# Altium PCB PCB.PcbDoc (part 7 of 7)
Units mm, origin at the board's own origin, x right, y up, seen from the top; angles counter-clockwise.
Board outline 78.8 x 69 mm, 12 copper layers (Top Layer, GND_12, uStrip1, GND_35, Clocks, GND_57, POWER, Slow_Ctrl, GND_810, uStrip2, GND_1012, Bottom Layer), stack 2.926 mm thick; 290 components, 212 nets, 1379 pads, 3418 vias.
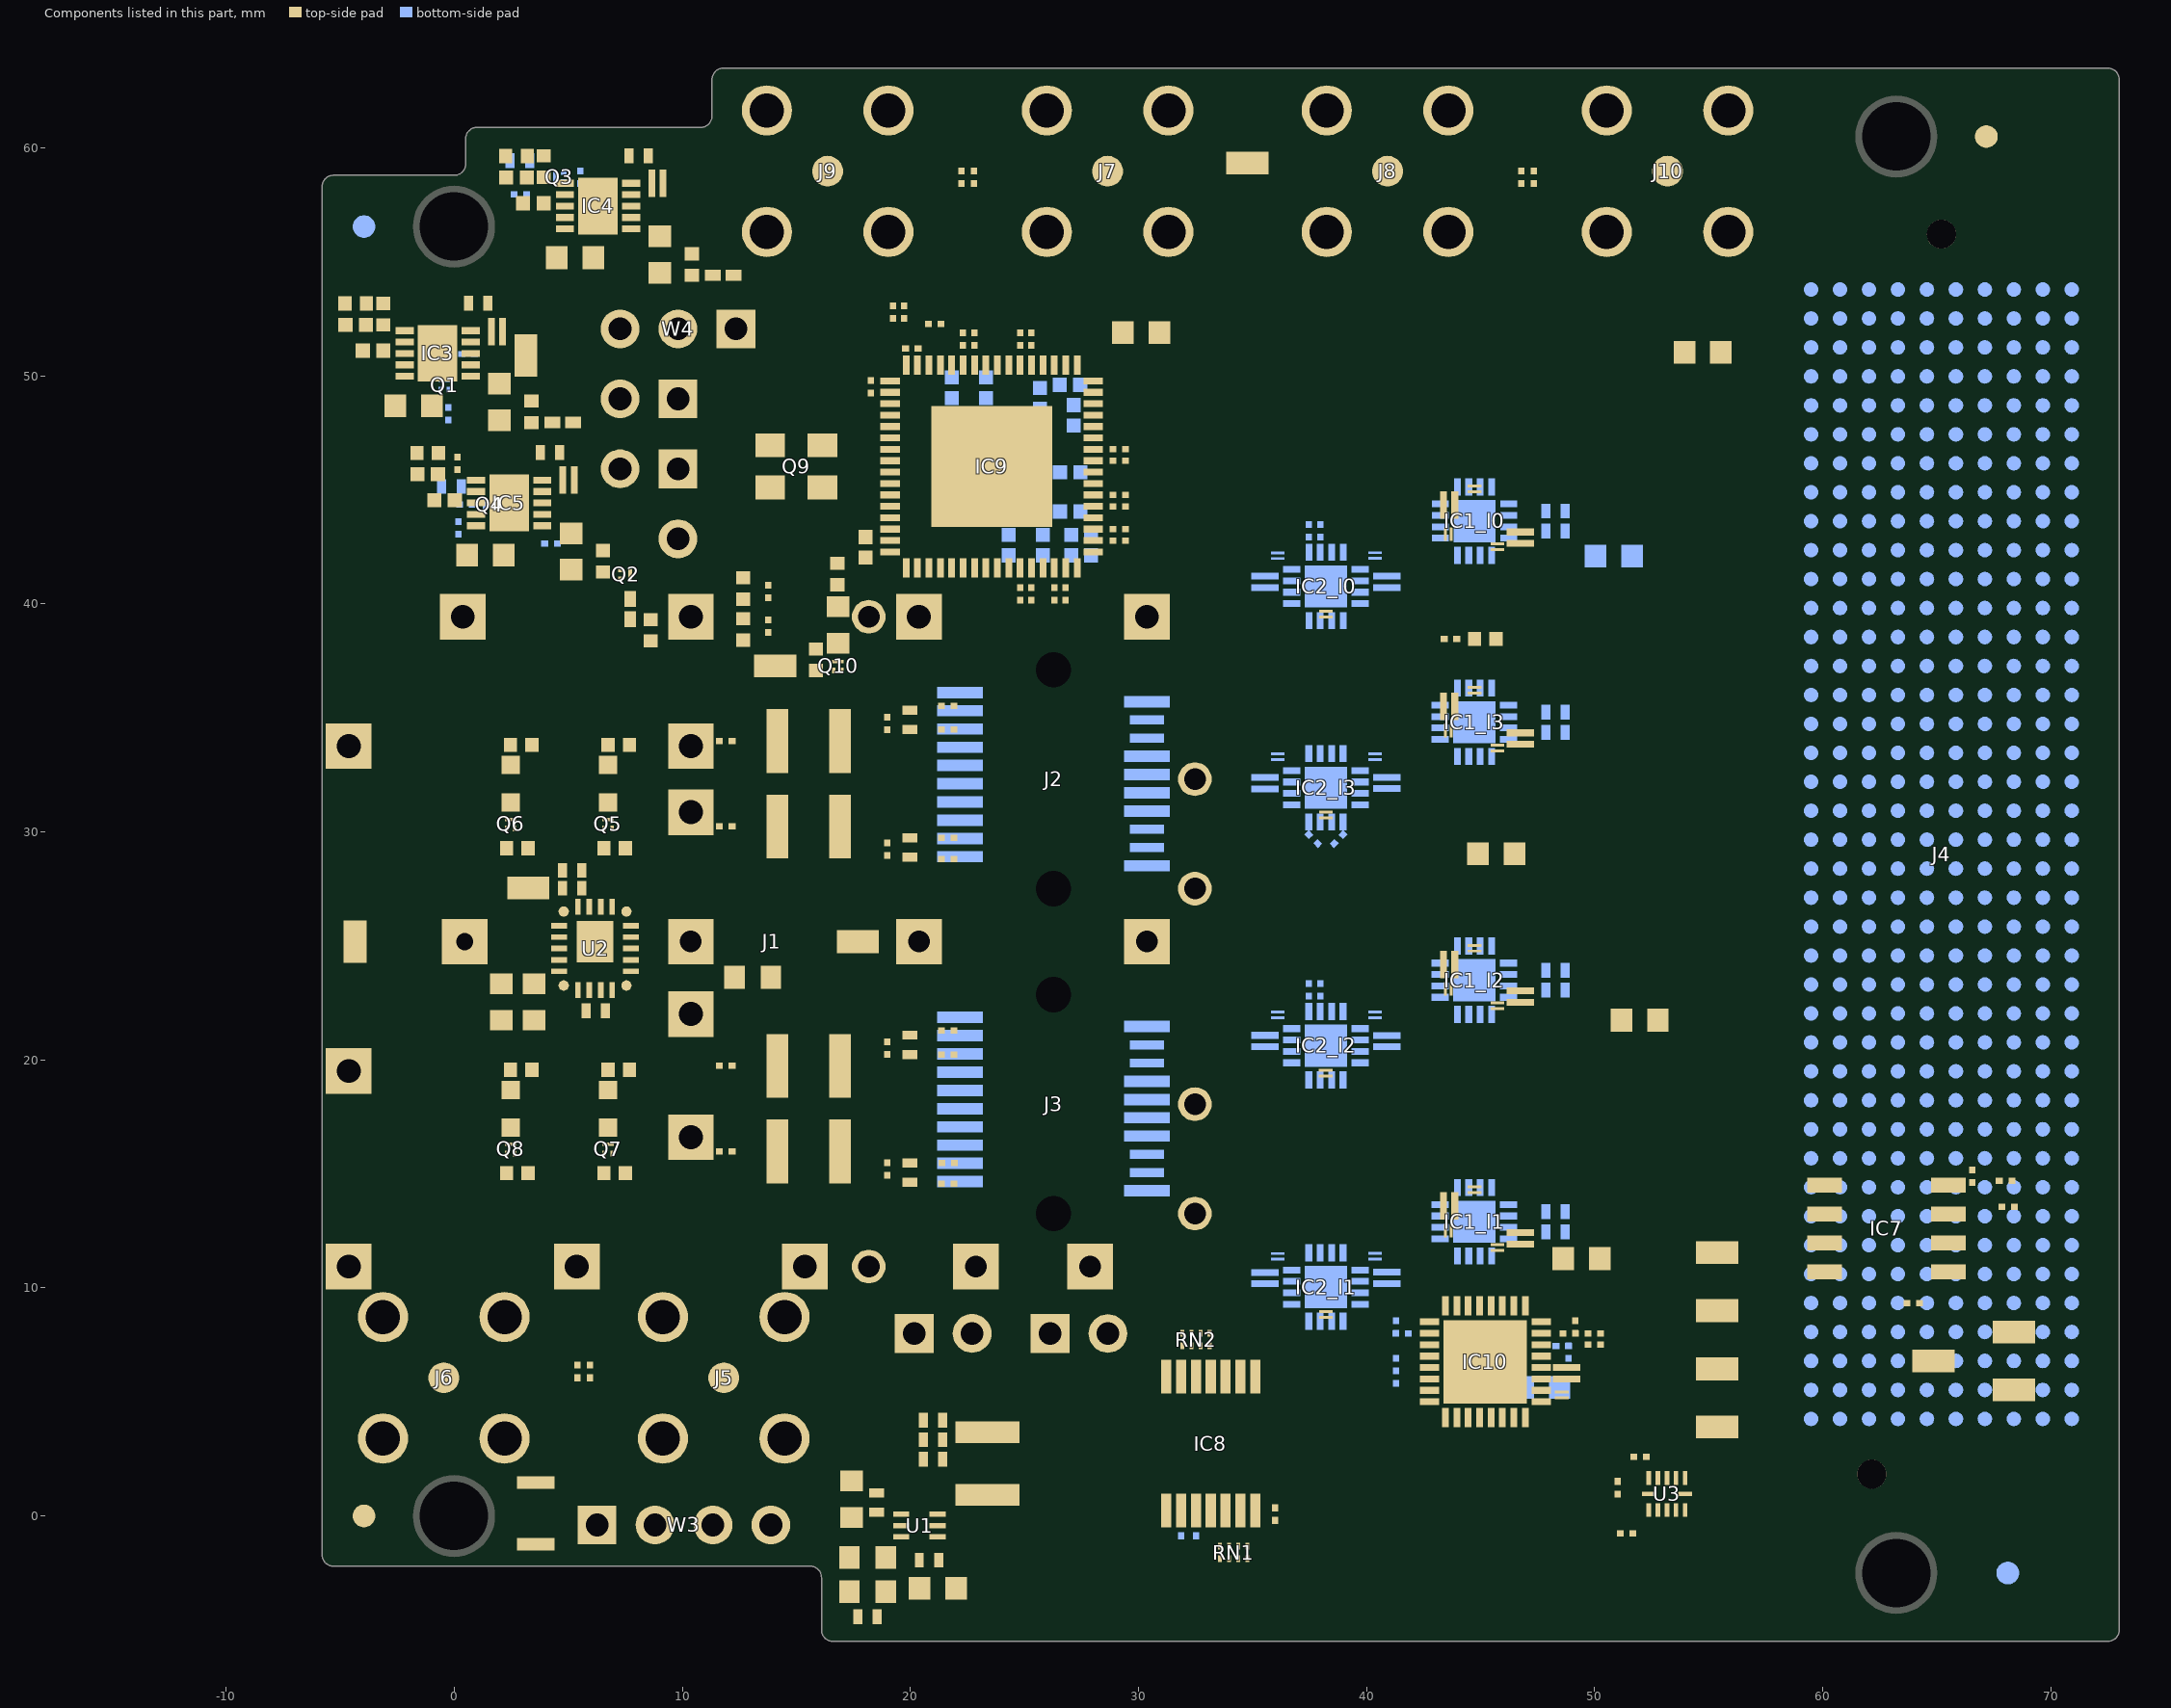
[diagram p16: the components of this part, seen from the top]

## Polygon pours and split planes (outlines as drawn) (continued)
P3V3 on GND_57 (split plane): -5.58,58.719 -5.627,58.68 -5.583,58.724 -5.526,58.748
P3V3 on GND_57 (split plane): -5.338,58.8 -5.398,58.794 -5.457,58.776 -5.399,58.8
P3V3 on GND_57 (split plane): 0.191,58.839 0.111,58.815 0.265,58.879
P3V3 on GND_57 (split plane): 0.353,58.947 0.288,58.894 0.406,59.012
P3V3 on GND_57 (split plane): 0.461,59.109 0.421,59.035 0.485,59.189
P3V3 on GND_57 (split plane): 0.506,60.498 0.5,60.438 0.5,60.499 0.524,60.557
P3V3 on GND_57 (split plane): 0.581,60.68 0.552,60.626 0.576,60.683 0.62,60.727
P3V3 on GND_57 (split plane): 0.72,60.819 0.673,60.78 0.717,60.824 0.774,60.848
P3V3 on GND_57 (split plane): 0.902,60.894 0.843,60.876 0.901,60.9 0.962,60.9
P3V3 on GND_57 (split plane): 10.991,60.939 10.911,60.915 11.065,60.979
P3V3 on GND_57 (split plane): 11.153,61.047 11.088,60.994 11.206,61.112
P3V3 on GND_57 (split plane): 11.261,61.209 11.221,61.135 11.285,61.289
P3V3 on GND_57 (split plane): 16.181,-5.28 16.22,-5.327 16.176,-5.283 16.152,-5.226
P3V3 on GND_57 (split plane): 16.32,-5.419 16.374,-5.448 16.317,-5.424 16.273,-5.38
P3V3 on GND_57 (split plane): 16.061,-2.509 16.085,-2.589 16.021,-2.435
P3V3 on GND_57 (split plane): 16.106,-5.098 16.124,-5.157 16.1,-5.099 16.1,-5.038
P3V3 on GND_57 (split plane): 16.502,-5.494 16.562,-5.5 16.501,-5.5 16.443,-5.476
P3V3 on GND_57 (split plane): 72.599,-5.5 72.538,-5.5 72.598,-5.494 72.657,-5.476
P3V3 on GND_57 (split plane): 72.783,-5.424 72.726,-5.448 72.78,-5.419 72.827,-5.38
P3V3 on GND_57 (split plane): 72.924,-5.283 72.88,-5.327 72.919,-5.28 72.948,-5.226
P3V3 on GND_57 (split plane): 73,-5.099 72.976,-5.157 72.994,-5.098 73,-5.038
P3V3 on GND_57 (split plane): 11.306,63.098 11.3,63.038 11.3,63.099 11.324,63.157
P3V3 on GND_57 (split plane): 15.791,-2.239 15.865,-2.279 15.711,-2.215
P3V3 on GND_57 (split plane): 11.381,63.28 11.352,63.226 11.376,63.283 11.42,63.327
P3V3 on GND_57 (split plane): 11.52,63.419 11.473,63.38 11.517,63.424 11.574,63.448
P3V3 on GND_57 (split plane): 11.702,63.494 11.643,63.476 11.701,63.5 11.762,63.5
P3V3 on GND_57 (split plane): 15.953,-2.347 16.006,-2.412 15.888,-2.294
P3V3 on GND_57 (split plane): 73,63.099 73,63.038 72.994,63.098 72.976,63.157
P3V3 on GND_57 (split plane): 72.657,63.476 72.598,63.494 72.538,63.5 72.599,63.5
P3V3 on GND_57 (split plane): 72.924,63.283 72.948,63.226 72.919,63.28 72.88,63.327
P3V3 on GND_57 (split plane): 72.783,63.424 72.827,63.38 72.78,63.419 72.726,63.448
P3V6 on POWER (split plane): 132 vertices, not listed, extent -5.545,-5.245 24.652,60.647
P3V3 on POWER (split plane): 78 vertices, not listed, extent 4.866,-1.109 68.883,35.551
1V8 on POWER (split plane): 48 vertices, not listed, extent -1.829,5.254 54.164,60.644
P2V05 on POWER (split plane): 7.271,35.64 7.271,26.681 1.275,26.681 1.275,34.928 1.278,34.961 1.264,35.009 1.241,35.039 1.237,35.045 1.235,35.046 1.233,35.049 -1.829,37.632 -1.829,43.881 1.496,43.881
3V3APLL on POWER (split plane): 25 vertices, not listed, extent 2.687,41.394 22.09,51.007
VccR0 on POWER (split plane): 30.022,32.244 19.775,32.244 19.768,34.052 30.022,34.052
3V3PS on POWER (split plane): 67 vertices, not listed, extent 9.667,5.254 72.745,63.245
VREFAC on POWER (split plane): 42 vertices, not listed, extent 43.577,10.756 45.869,45.399
VADJ on POWER (split plane): 17 vertices, not listed, extent 37.821,-1.109 65.947,6.036
P12V on POWER (split plane): 40 vertices, not listed, extent 21.364,-5.245 72.745,11.007
VccR1 on POWER (split plane): 30.022,17.994 19.775,17.994 19.775,19.802 30.022,19.802
VccT0 on POWER (split plane): 30.022,30.178 19.775,30.178 19.775,31.986 30.022,31.986
P3V3A on POWER (split plane): 68.248,13.279 65.967,13.279 65.967,15.561 68.248,15.561
VccT1 on POWER (split plane): 30.022,15.928 19.775,15.928 19.775,17.736 30.022,17.736
no net on GND_810 (split plane): -5.794,-1.798 -5.776,-1.857 -5.8,-1.799 -5.8,-1.738
no net on GND_810 (split plane): -5.719,-1.98 -5.68,-2.027 -5.724,-1.983 -5.748,-1.926
no net on GND_810 (split plane): -5.794,58.398 -5.8,58.338 -5.8,58.399 -5.776,58.457
no net on GND_810 (split plane): -5.719,58.58 -5.748,58.526 -5.724,58.583 -5.68,58.627
no net on GND_810 (split plane): -5.58,-2.119 -5.526,-2.148 -5.583,-2.124 -5.627,-2.08
no net on GND_810 (split plane): -5.398,-2.194 -5.338,-2.2 -5.399,-2.2 -5.457,-2.176
GND on GND_810 (split plane): 143 vertices, not listed, extent -5.799,-5.499 72.999,63.499
no net on GND_810 (split plane): -5.58,58.719 -5.627,58.68 -5.583,58.724 -5.526,58.748
no net on GND_810 (split plane): -5.338,58.8 -5.398,58.794 -5.457,58.776 -5.399,58.8
no net on GND_810 (split plane): 0.191,58.839 0.111,58.815 0.265,58.879
no net on GND_810 (split plane): 0.353,58.947 0.288,58.894 0.406,59.012
no net on GND_810 (split plane): 0.461,59.109 0.421,59.035 0.485,59.189
no net on GND_810 (split plane): 0.506,60.498 0.5,60.438 0.5,60.499 0.524,60.557
no net on GND_810 (split plane): 0.581,60.68 0.552,60.626 0.576,60.683 0.62,60.727
no net on GND_810 (split plane): 0.72,60.819 0.673,60.78 0.717,60.824 0.774,60.848
no net on GND_810 (split plane): 0.902,60.894 0.843,60.876 0.901,60.9 0.962,60.9
no net on GND_810 (split plane): 10.991,60.939 10.911,60.915 11.065,60.979
no net on GND_810 (split plane): 11.153,61.047 11.088,60.994 11.206,61.112
no net on GND_810 (split plane): 11.261,61.209 11.221,61.135 11.285,61.289
no net on GND_810 (split plane): 16.181,-5.28 16.22,-5.327 16.176,-5.283 16.152,-5.226
no net on GND_810 (split plane): 16.32,-5.419 16.374,-5.448 16.317,-5.424 16.273,-5.38
no net on GND_810 (split plane): 16.061,-2.509 16.085,-2.589 16.021,-2.435
no net on GND_810 (split plane): 16.106,-5.098 16.124,-5.157 16.1,-5.099 16.1,-5.038
no net on GND_810 (split plane): 16.502,-5.494 16.562,-5.5 16.501,-5.5 16.443,-5.476
no net on GND_810 (split plane): 72.599,-5.5 72.538,-5.5 72.598,-5.494 72.657,-5.476
no net on GND_810 (split plane): 72.783,-5.424 72.726,-5.448 72.78,-5.419 72.827,-5.38
no net on GND_810 (split plane): 72.924,-5.283 72.88,-5.327 72.919,-5.28 72.948,-5.226
no net on GND_810 (split plane): 73,-5.099 72.976,-5.157 72.994,-5.098 73,-5.038
no net on GND_810 (split plane): 11.306,63.098 11.3,63.038 11.3,63.099 11.324,63.157
no net on GND_810 (split plane): 15.791,-2.239 15.865,-2.279 15.711,-2.215
no net on GND_810 (split plane): 11.381,63.28 11.352,63.226 11.376,63.283 11.42,63.327
no net on GND_810 (split plane): 11.52,63.419 11.473,63.38 11.517,63.424 11.574,63.448
no net on GND_810 (split plane): 11.702,63.494 11.643,63.476 11.701,63.5 11.762,63.5
no net on GND_810 (split plane): 15.953,-2.347 16.006,-2.412 15.888,-2.294
no net on GND_810 (split plane): 73,63.099 73,63.038 72.994,63.098 72.976,63.157
no net on GND_810 (split plane): 72.657,63.476 72.598,63.494 72.538,63.5 72.599,63.5
no net on GND_810 (split plane): 72.924,63.283 72.948,63.226 72.919,63.28 72.88,63.327
no net on GND_810 (split plane): 72.783,63.424 72.827,63.38 72.78,63.419 72.726,63.448
no net on GND_1012 (split plane): -5.794,-1.798 -5.776,-1.857 -5.8,-1.799 -5.8,-1.738
no net on GND_1012 (split plane): -5.719,-1.98 -5.68,-2.027 -5.724,-1.983 -5.748,-1.926
no net on GND_1012 (split plane): -5.794,58.398 -5.8,58.338 -5.8,58.399 -5.776,58.457
no net on GND_1012 (split plane): -5.719,58.58 -5.748,58.526 -5.724,58.583 -5.68,58.627
no net on GND_1012 (split plane): -5.58,-2.119 -5.526,-2.148 -5.583,-2.124 -5.627,-2.08
no net on GND_1012 (split plane): -5.398,-2.194 -5.338,-2.2 -5.399,-2.2 -5.457,-2.176
GND on GND_1012 (split plane): 143 vertices, not listed, extent -5.799,-5.499 72.999,63.499
no net on GND_1012 (split plane): -5.58,58.719 -5.627,58.68 -5.583,58.724 -5.526,58.748
no net on GND_1012 (split plane): -5.338,58.8 -5.398,58.794 -5.457,58.776 -5.399,58.8
no net on GND_1012 (split plane): 0.191,58.839 0.111,58.815 0.265,58.879
no net on GND_1012 (split plane): 0.353,58.947 0.288,58.894 0.406,59.012
no net on GND_1012 (split plane): 0.461,59.109 0.421,59.035 0.485,59.189
no net on GND_1012 (split plane): 0.506,60.498 0.5,60.438 0.5,60.499 0.524,60.557
no net on GND_1012 (split plane): 0.581,60.68 0.552,60.626 0.576,60.683 0.62,60.727
no net on GND_1012 (split plane): 0.72,60.819 0.673,60.78 0.717,60.824 0.774,60.848
no net on GND_1012 (split plane): 0.902,60.894 0.843,60.876 0.901,60.9 0.962,60.9
no net on GND_1012 (split plane): 10.991,60.939 10.911,60.915 11.065,60.979
no net on GND_1012 (split plane): 11.153,61.047 11.088,60.994 11.206,61.112
no net on GND_1012 (split plane): 11.261,61.209 11.221,61.135 11.285,61.289
no net on GND_1012 (split plane): 16.181,-5.28 16.22,-5.327 16.176,-5.283 16.152,-5.226
no net on GND_1012 (split plane): 16.32,-5.419 16.374,-5.448 16.317,-5.424 16.273,-5.38
no net on GND_1012 (split plane): 16.061,-2.509 16.085,-2.589 16.021,-2.435
no net on GND_1012 (split plane): 16.106,-5.098 16.124,-5.157 16.1,-5.099 16.1,-5.038
no net on GND_1012 (split plane): 16.502,-5.494 16.562,-5.5 16.501,-5.5 16.443,-5.476
no net on GND_1012 (split plane): 72.599,-5.5 72.538,-5.5 72.598,-5.494 72.657,-5.476
no net on GND_1012 (split plane): 72.783,-5.424 72.726,-5.448 72.78,-5.419 72.827,-5.38
no net on GND_1012 (split plane): 72.924,-5.283 72.88,-5.327 72.919,-5.28 72.948,-5.226
no net on GND_1012 (split plane): 73,-5.099 72.976,-5.157 72.994,-5.098 73,-5.038
no net on GND_1012 (split plane): 11.306,63.098 11.3,63.038 11.3,63.099 11.324,63.157
no net on GND_1012 (split plane): 15.791,-2.239 15.865,-2.279 15.711,-2.215
no net on GND_1012 (split plane): 11.381,63.28 11.352,63.226 11.376,63.283 11.42,63.327
no net on GND_1012 (split plane): 11.52,63.419 11.473,63.38 11.517,63.424 11.574,63.448
no net on GND_1012 (split plane): 11.702,63.494 11.643,63.476 11.701,63.5 11.762,63.5
no net on GND_1012 (split plane): 15.953,-2.347 16.006,-2.412 15.888,-2.294
no net on GND_1012 (split plane): 73,63.099 73,63.038 72.994,63.098 72.976,63.157
no net on GND_1012 (split plane): 72.657,63.476 72.598,63.494 72.538,63.5 72.599,63.5
no net on GND_1012 (split plane): 72.924,63.283 72.948,63.226 72.919,63.28 72.88,63.327
no net on GND_1012 (split plane): 72.783,63.424 72.827,63.38 72.78,63.419 72.726,63.448

## Keep-outs
Keep-Out Layer:
  lines w0.254: 73.127,-5.001 cw(c72.5,-5) 72.5,-5.627 16.6,-5.627 ; 73.127,-5 73.127,63 ccw(c72.5,63) 73.127,63.001 ccw(c72.5,63) 72.501,63.627 ; -5.927,-1.7 ccw(c-5.3,-1.7) -5.3,-2.327 ; -5.927,-1.7 -5.927,58.3 ; -5.927,-1.7 -5.927,-1.7 ; -5.927,-1.7 -5.927,-1.7 ; -5.927,58.3 cw(c-5.3,58.3) -5.301,58.927 ; -5.927,58.3 -5.927,58.3 ; -5.301,58.927 cw(c-5.3,58.8) -5.3,58.927 ; -5.301,58.927 cw(c-5.3,58.3) -5.3,58.927 ; -5.3,-2.327 14.7,-2.327 15.599,-2.327 ; -5.3,-2.327 -5.3,-2.327 ; -5.3,-2.327 -5.3,-2.327 ; -5.3,58.927 -2,58.927 -0.5,58.927 0,58.927 ; 0,58.927 ccw(c0,59.3) 0.373,59.3 ; 0,58.927 ccw(c0,59.3) 0,58.927 ; 0,58.927 ccw(c0,58.8) 0,58.927 ; 0,58.927 ccw(c0,58.8) 0,58.927 ; 0,58.927 0,58.927 ; 0.373,59.3 cw(c0.5,59.3) 0.373,59.301 ; 0.373,59.3 ccw(c0,59.3) 0.373,59.3 ; 0.373,59.3 0.373,59.301 ; 0.373,59.301 0.373,60.4 ; 0.373,60.4 cw(c1,60.4) 0.999,61.027 ; 0.373,60.4 0.373,60.4 ; 1,61.027 ccw(c1,60.9) 1,61.027 ; 1,61.027 ccw(c1,60.9) 0.999,61.027 ; 1,61.027 ccw(c1,60.4) 0.999,61.027 ; 1,61.027 8,61.027 10.4,61.027 10.8,61.027 ; 10.8,61.027 ccw(c10.8,61.4) 11.173,61.4 ; 10.8,61.027 ccw(c10.8,61.4) 10.8,61.027 ; 10.8,61.027 ccw(c10.8,60.9) 10.8,61.027 ; 10.8,61.027 ccw(c10.8,60.9) 10.8,61.027 ; 10.8,61.027 10.8,61.027 ; 11.173,61.401 ccw(c11.3,61.4) 11.173,61.4 ; 11.173,61.4 ccw(c10.8,61.4) 11.173,61.4 ; 11.173,61.401 11.173,63 cw(c11.8,63) 11.799,63.627 ; 11.173,61.4 11.173,61.401 ; 11.8,63.627 ccw(c11.8,63.5) 11.8,63.627 ; 11.8,63.627 ccw(c11.8,63.5) 11.799,63.627 ; 11.8,63.627 ccw(c11.8,63) 11.799,63.627 ; 11.8,63.627 72.5,63.627 ; 15.599,-2.327 ccw(c15.6,-2.2) 15.6,-2.327 ; 15.599,-2.327 15.6,-2.327 ; 15.6,-2.327 cw(c15.6,-2.7) 15.973,-2.7 ; 15.973,-2.701 cw(c16.1,-2.7) 15.973,-2.7 ; 15.973,-2.701 15.973,-2.7 ; 15.973,-2.701 15.973,-5 ccw(c16.6,-5) 16.6,-5.627 ; 15.973,-2.7 ccw(c15.6,-2.7) 15.973,-2.7 ; 16.6,-5.627 ccw(c16.6,-5.5) 16.6,-5.627 ; 16.6,-5.627 ccw(c16.6,-5.5) 16.6,-5.627 ; 16.6,-5.627 ccw(c16.6,-5.5) 16.6,-5.627 ; 16.6,-5.627 ccw(c16.6,-5.5) 16.6,-5.627 ; 16.6,-5.627 16.6,-5.627 ; 16.6,-5.627 16.6,-5.627 ; 72.501,63.627 ccw(c72.5,63) 72.5,63.627

## Other copper
Top Layer:
  region net FPGA_TX1_C_P: 49.003,8.163 49.003,7.863 49.303,7.863 49.303,8.163
  rectangle net VREFAC: 43.801,38.157 45.207,38.777
  region net NetC12_l0_2: 37.978,39.497 37.978,38.953 38.478,38.953 38.478,39.497
  region net NetC12_l3_2: 37.977,30.671 37.977,30.128 38.477,30.128 38.477,30.671
  region net NetC12_l2_2: 37.968,19.358 37.968,18.814 38.468,18.814 38.468,19.358
  region net NetC12_l1_2: 37.977,8.771 37.977,8.227 38.477,8.227 38.477,8.771
  rectangle net XTAL_GND: 18.333,46.78 18.582,47.032
  pour cut-out: 63.862,10.154 63.839,10.281 64.874,10.281 64.851,10.154
  pour cut-out: 7.184,-0.099 7.161,0.028 7.936,0.028 7.913,-0.099
  pour cut-out: 12.225,-0.821 12.202,-0.694 13.024,-0.694 13.001,-0.821
  pour cut-out: 62.735,14.379 62.713,14.501 64.167,14.501 64.145,14.379
  pour cut-out: 3.145,34.231 2.573,34.231 2.606,34.104 3.118,34.104
  pour cut-out: 7.574,34.231 7.002,34.231 7.036,34.104 7.548,34.104
  pour cut-out: 2.97,29.699 2.398,29.699 2.431,29.572 2.943,29.572
  pour cut-out: 15.569,36.902 14.997,36.902 15.031,36.775 15.543,36.775
  pour cut-out: 27.757,15.819 26.849,15.819 26.883,15.692 27.731,15.692
  pour cut-out: 32.045,10.698 31.473,10.698 31.506,10.571 32.018,10.571
  pour cut-out: 59.463,13.58 59.336,13.557 59.336,14.241 59.463,14.218
  pour cut-out: 3.277,58.292 3.277,57.977 3.404,58.011 3.404,58.265
  pour cut-out: 8.302,59.524 7.988,59.524 8.021,59.397 8.275,59.397
  pour cut-out: -3.755,51.83 -3.755,51.515 -3.628,51.549 -3.628,51.803
  pour cut-out: 1.27,53.062 0.955,53.062 0.989,52.935 1.243,52.935
  pour cut-out: 4.409,46.507 4.095,46.507 4.129,46.38 4.383,46.38
  pour cut-out: -0.616,45.275 -0.616,44.96 -0.489,44.994 -0.489,45.248
  pour cut-out: 14.232,39.636 14.232,39.95 14.105,39.917 14.105,39.663
  region net NetC31_2: 7.351,57.799 8.803,57.799 8.803,59.977 8.311,59.977 8.311,59.3 8.503,59.3 8.503,58.099 7.351,58.099
  region net NetC18_2: 0.318,51.337 1.771,51.337 1.771,53.515 1.278,53.515 1.278,52.865 1.471,52.865 1.471,51.637 0.318,51.637
  pour cut-out: 51.647,21.897 51.647,21.583 51.774,21.617 51.774,21.871
  pour cut-out: 44.409,28.896 44.409,29.21 44.282,29.176 44.282,28.922
  pour cut-out: 45.359,29.203 45.359,28.888 45.486,28.922 45.486,29.176
  pour cut-out: 30.433,51.754 30.433,52.068 30.306,52.035 30.306,51.781
  pour cut-out: 31.383,52.061 31.383,51.747 31.51,51.781 31.51,52.035
  pour cut-out: 55.063,50.88 55.063,51.195 54.936,51.161 54.936,50.907
  pour cut-out: 56.013,51.188 56.013,50.873 56.14,50.907 56.14,51.161
  pour cut-out: 50.697,21.59 50.697,21.904 50.57,21.871 50.57,21.617
  pour cut-out: 48.142,11.135 48.142,11.449 48.015,11.416 48.015,11.162
  pour cut-out: 49.092,11.442 49.092,11.128 49.219,11.162 49.219,11.416
  region net NetC22_2: 19.95,-0.034 18.182,-0.034 18.182,0.365 19.241,0.365 19.95,0.195
  pour cut-out: 18.934,0.435 18.934,0.793 18.743,0.536
  region net NetC29_1: 19.95,-0.805 19.239,-0.805 16.872,-0.805 16.872,-1.325 16.872,-3.826 17.497,-4.747 17.897,-4.747 17.897,-4.097 17.772,-3.826 17.772,-2.325 17.772,-1.325 19.239,-1.034 19.95,-1.034
  region net P3V6: 18.347,-4.097 18.472,-2.826 19.372,-2.826 19.372,-3.826 18.747,-4.747 18.347,-4.747
  pour cut-out: 18.345,-3.07 18.345,-1.305 17.924,-1.409 17.924,-3.001
  pour cut-out: 18.345,-2.429 18.345,-2.787 18.756,-2.826 18.756,-2.445
  pour cut-out: 20.975,-2.619 20.975,-2.261 20.554,-2.364 20.554,-2.549
  region net 3V3APLL: 18.432,43.348 18.714,43.63 19.533,43.63 19.533,43.93 18.218,43.93 17.722,43.434 17.722,42.62 18.432,42.62
  region net P3V3: 33.204,8.158 33.204,7.858 31.829,7.858 31.829,8.158
  region net NetR55_1: 12.168,40.903 12.665,40.903 12.665,41.403 12.168,41.403
  region net NetR56_1: 12.168,38.163 12.665,38.163 12.665,38.663 12.168,38.663
  region net PLL_Lock: 15.362,37.771 15.86,37.771 15.86,38.271 15.362,38.271
  region net XTAL_GND: 18.433,44.88 18.183,45.13 18.483,45.43 19.533,45.43 19.533,45.13 18.683,45.13
  region net XTAL_GND: 18.433,47.18 18.183,46.93 18.483,46.63 19.533,46.63 19.533,46.93 18.683,46.93
  region net SFP0_LOS: 2.982,29.785 2.982,29.204 3.482,29.204 3.482,29.785
  region net VccT1: 7.93,18.473 7.93,19.653 7.43,19.653 7.43,18.473
  region net VccR0: 3.657,33.322 3.657,33.903 3.157,33.903 3.157,33.322
  region net VccT0: 7.93,32.723 7.93,33.903 7.43,33.903 7.43,32.723
  region net SFP0_FAULT: 7.255,29.785 7.255,29.204 7.755,29.204 7.755,29.785
  region net VccR1: 3.657,19.072 3.657,19.653 3.157,19.653 3.157,19.072
  region net SFP1_LOS: 2.982,15.535 2.982,14.954 3.482,14.954 3.482,15.535
  region net SFP1_FAULT: 7.255,15.535 7.255,14.954 7.755,14.954 7.755,15.535
  region net NetIC4_6: 2.867,59.952 4.451,59.952 5.251,59.332 5.251,58.299 4.451,58.299 4.451,59.332 2.867,59.332
  region net NetC30_2: 2.847,59.012 4.227,59.012 4.227,58.392 4.492,58.099 5.251,58.099 5.251,57.799 4.451,57.799 3.917,58.392 2.847,58.392
  region net P3V6: 5.251,57.099 5.251,55.799 4.317,55.799 4.317,57.099
  region net 3V3PS_EN: 7.501,58.845 7.501,58.299 8.001,58.299 8.001,58.845
  region net NetIC5_6: -1.026,46.935 0.558,46.935 1.358,46.315 1.358,45.282 0.558,45.282 0.558,46.236 -1.026,46.236
  region net NetC39_2: -1.046,46.076 0.334,46.076 0.334,45.375 0.6,45.082 1.358,45.082 1.358,44.782 0.558,44.782 0.024,45.375 -1.046,45.375
  region net 1V8_EN: 3.608,45.828 3.608,45.282 4.108,45.282 4.108,45.828
  region net P2V05: 1.358,44.082 1.358,42.782 0.424,42.782 0.424,44.082
  region net NetC40_2: 3.458,44.782 4.911,44.782 4.911,46.96 4.418,46.96 4.418,46.31 4.611,46.31 4.611,45.082 3.458,45.082
  region net P3V6: -1.782,50.637 -1.782,49.337 -2.715,49.337 -2.715,50.637
  region net 3V3APLL_EN: 0.468,52.383 0.468,51.837 0.968,51.837 0.968,52.383
  region net NetC17_2: -4.186,52.55 -2.806,52.55 -2.806,51.93 -2.54,51.637 -1.782,51.637 -1.782,51.337 -2.582,51.337 -3.116,51.93 -4.186,51.93
  region net NetIC3_6: -4.166,53.49 -2.582,53.49 -1.782,52.87 -1.782,51.837 -2.582,51.837 -2.582,52.87 -4.166,52.87
uStrip1:
  pour cut-out: 53.195,57.981 cw(c53.195,58.981) 52.195,58.981 cw(c53.195,58.981) 53.195,59.981 cw(c53.195,58.981) 54.195,58.981 cw(c53.195,58.981)
  pour cut-out: 40.92,57.981 cw(c40.92,58.981) 39.92,58.981 cw(c40.92,58.981) 40.92,59.981 cw(c40.92,58.981) 41.92,58.981 cw(c40.92,58.981)
  pour cut-out: 28.645,57.981 cw(c28.645,58.981) 27.645,58.981 cw(c28.645,58.981) 28.645,59.981 cw(c28.645,58.981) 29.645,58.981 cw(c28.645,58.981)
  pour cut-out: 16.37,57.981 cw(c16.37,58.981) 15.37,58.981 cw(c16.37,58.981) 16.37,59.981 cw(c16.37,58.981) 17.37,58.981 cw(c16.37,58.981)
  pour cut-out: -0.461,5.062 cw(c-0.461,6.062) -1.461,6.062 cw(c-0.461,6.062) -0.461,7.062 cw(c-0.461,6.062) 0.539,6.062 cw(c-0.461,6.062)
  pour cut-out: 11.814,5.062 cw(c11.814,6.062) 10.814,6.062 cw(c11.814,6.062) 11.814,7.062 cw(c11.814,6.062) 12.814,6.062 cw(c11.814,6.062)
  pour cut-out: 53.734,5.946 53.711,6.073 54.478,6.073 54.455,5.946
  pour cut-out: 55.206,9.768 55.333,9.791 55.333,9.14 55.206,9.163
  pour cut-out: 20.296,47.123 18.546,48.872 12.614,48.872 11.673,47.931 11.673,43.869 13.094,42.454 18.09,42.454 20.296,44.66
Clocks:
  pour cut-out: 59.394,36.747 58.709,36.747 ccw(c58.709,36.578) 58.541,36.56
  pour cut-out: 55.138,15.026 55.138,15.711 ccw(c54.969,15.711) 54.951,15.879
  pour cut-out: 20.296,47.123 18.546,48.872 12.614,48.872 11.673,47.931 11.673,43.869 13.094,42.454 18.09,42.454 20.296,44.66
Slow_Ctrl:
  pour cut-out: 22.788,31.735 23.514,31.735 23.514,30.844
  pour cut-out: 22.988,20.211 22.988,20.938 23.878,20.938
  pour cut-out: 24.492,14.216 24.492,13.49 23.602,13.49
  pour cut-out: 53.209,2.943 52.949,3.282 54.062,3.282
  pour cut-out: 52.979,-0.021 52.979,0.869 53.869,0.869
  pour cut-out: 45.639,1.091 45.639,1.818 46.529,1.818
  pour cut-out: 65.07,43.275 65.07,44.001 65.96,44.001
  pour cut-out: 21.003,18.3 21.003,17.573 20.112,17.573
  pour cut-out: 31.401,9.975 31.401,10.702 32.292,10.702
  pour cut-out: 27.379,7.289 27.595,5.756 25.817,6.014
  pour cut-out: 49.872,-3.646 49.872,-4.907 47.841,-4.907
  pour cut-out: 23.504,34.555 23.504,33.014 22.074,33.124
  pour cut-out: 67.001,40.102 67.001,40.85 67.599,40.85
  pour cut-out: 67.214,44.703 67.214,43.896 66.225,43.896
  pour cut-out: 52.475,52.49 52.475,52.979 53.073,52.979
  pour cut-out: 21.812,53.146 21.812,53.635 22.41,53.635
  pour cut-out: 9.015,53.649 9.015,54.137 9.613,54.137
  pour cut-out: 20.296,47.123 18.546,48.872 12.614,48.872 11.673,47.931 11.673,43.869 13.094,42.454 18.09,42.454 20.296,44.66
uStrip2:
  pour cut-out: 20.296,47.123 18.546,48.872 12.614,48.872 11.673,47.931 11.673,43.869 13.094,42.454 18.09,42.454 20.296,44.66
Bottom Layer:
  pour cut-out: 5.834,59.28 5.834,59.579 5.566,59.579
  pour cut-out: 26.879,43.434 26.752,43.411 26.752,43.711 26.879,43.688
  region net 3V3_PS_DIS: 5.242,59.28 5.242,58.845 5.834,58.845 5.834,59.28
  pour cut-out: 51.159,41.941 51.159,42.255 51.032,42.222 51.032,41.968
  pour cut-out: 52.109,42.248 52.109,41.934 52.236,41.968 52.236,42.222
  pour cut-out: 63.253,35.462 63.38,35.485 63.38,35.185 63.253,35.208
  pour cut-out: 57.562,36.351 57.585,36.224 57.285,36.224 57.308,36.351
  pour cut-out: 1.004,51.225 1.027,51.098 0.727,51.098 0.75,51.225
  pour cut-out: 4.791,42.531 4.664,42.508 4.664,42.808 4.791,42.785
  pour cut-out: -0.877,45.307 -0.75,45.33 -0.75,45.03 -0.877,45.053
  pour cut-out: -0.527,48.195 -0.4,48.218 -0.4,47.918 -0.527,47.941
  pour cut-out: 0.75,50.697 0.727,50.824 1.027,50.824 1.004,50.697
  pour cut-out: 2.777,59.323 2.65,59.3 2.65,59.6 2.777,59.577
  pour cut-out: 2.123,59.577 2.25,59.6 2.25,59.3 2.123,59.323
  pour cut-out: 5.39,58.168 5.367,58.295 5.667,58.295 5.644,58.168
  region net 3V3PS: 47.987,6.131 47.987,5.131 49.758,5.131 49.758,6.131
  pour cut-out: 20.296,47.123 18.546,48.872 12.614,48.872 11.673,47.931 11.673,43.869 13.094,42.454 18.09,42.454 20.296,44.66
GND_12 (plane layer: these items are gaps in the copper):
  region: 53.195,57.981 cw(c53.195,58.981) 52.195,58.981 cw(c53.195,58.981) 53.195,59.981 cw(c53.195,58.981) 54.195,58.981 cw(c53.195,58.981)
  region: 40.92,57.981 cw(c40.92,58.981) 39.92,58.981 cw(c40.92,58.981) 40.92,59.981 cw(c40.92,58.981) 41.92,58.981 cw(c40.92,58.981)
  region: 28.645,57.981 cw(c28.645,58.981) 27.645,58.981 cw(c28.645,58.981) 28.645,59.981 cw(c28.645,58.981) 29.645,58.981 cw(c28.645,58.981)
  region: 16.37,57.981 cw(c16.37,58.981) 15.37,58.981 cw(c16.37,58.981) 16.37,59.981 cw(c16.37,58.981) 17.37,58.981 cw(c16.37,58.981)
  region: 11.814,5.062 cw(c11.814,6.062) 10.814,6.062 cw(c11.814,6.062) 11.814,7.062 cw(c11.814,6.062) 12.814,6.062 cw(c11.814,6.062)
  region: -0.461,5.062 cw(c-0.461,6.062) -1.461,6.062 cw(c-0.461,6.062) -0.461,7.062 cw(c-0.461,6.062) 0.539,6.062 cw(c-0.461,6.062)
  lines w0.762: 11.931,44.118 13.238,42.81 18.051,42.81 20.044,44.803 20.044,47.127 18.457,48.714 12.667,48.714 11.931,47.978 11.931,44.118
POWER (plane layer: these items are gaps in the copper):
  region: 11.673,42.673 17.077,42.673 18.398,43.994 20.296,44.011 20.296,48.832 11.673,48.832
  lines w0.254: -1.959,44.012 -1.959,37.571 1.149,34.95 ; 1.145,34.953 1.145,26.552 4.704,26.552 7.4,26.552 7.4,35.681 ; 3.631,60.9 3.631,53.928 2.085,53.928 -1.936,50.755 -1.959,44.011 1.564,44.011 7.4,35.681 ; 4.736,26.552 4.736,6.679 24.782,6.679 24.782,0.412 ; 11.673,43.873 11.673,47.931 ; 11.673,48.832 11.673,42.673 16.489,42.673 ; 19.646,17.865 30.151,17.865 ; 20.296,44.66 20.296,47.123 ; 21.235,-5.5 21.235,0.412 24.8,0.412 26.449,-1.238 31.776,-1.238 32.573,-1.238 55.332,-1.238 58.97,2.4 60.181,3.612 69.013,3.612 69.013,7.557 67.988,7.557 67.988,11.136 69.138,11.136 73,7.274 ; 30.151,32.115 19.646,32.115 ; 37.691,-1.238 37.691,-0.304 54.33,-0.304 60.799,6.165 66.072,6.165 66.072,4.012 66.076,4.008 66.076,3.612 ; 47.248,5.168 47.248,7.143 54.294,14.189 54.294,55.632 9.537,55.632 9.537,60.9 ; 67.988,9.975 55.747,9.975 53.713,7.941 50.897,5.125 40.282,5.125 30.151,15.799 ; 7.4,35.681 13.262,35.681 13.262,25.821 19.646,19.931 ; 9.537,60.9 ccw(c9.537,60.9) 9.537,60.9 ; 9.537,60.9 ccw(c9.537,60.9) 9.537,60.9 ; 16.1,-2.7 ccw(c16.1,-2.7) 16.1,-2.7 ; 16.1,-2.7 16.1,-2.7 ; 16.489,42.673 16.489,41.264 22.22,41.264 22.22,48.819 21.489,49.549 21.489,51.137 2.558,51.137 2.558,48.832 20.296,48.832 20.296,43.994 18.398,43.994 17.077,42.673 16.489,42.673 ; 19.646,19.931 19.646,15.799 30.151,15.799 ; 19.646,19.931 30.151,19.931 30.151,15.799 ; 19.646,32.115 19.646,30.049 30.151,30.049 30.151,34.181 19.638,34.181 19.646,32.115 ; 72.5,63.5 ccw(c72.5,63.5) 72.5,63.5 ; 72.5,63.5 72.5,63.5 ; 73,7.274 ccw(c73,7.274) 73,7.274 ; 0,58.8 0,58.8 ; 11.3,63 ccw(c11.3,63) 11.3,63 ; 16.6,-5.5 16.6,-5.5 ; 43.448,21.652 43.449,12.186 44.637,10.626 45.999,10.626 45.999,45.528 43.449,45.528 43.449,42.464 43.942,42.464 43.942,41.789 43.449,41.789 43.448,33.641 43.941,33.641 43.941,32.966 43.448,32.966 43.448,22.327 43.941,22.327 43.941,21.652 43.448,21.652 ; 51.001,63.5 ccw(c51.001,63.5) 51.001,63.5 ; 65.838,13.15 68.378,13.15 68.378,15.69 65.838,15.69 65.838,13.15 ; 73,-5 73,-5
  lines w0.508: 0.5,60.4 0.5,59.3 cw(c0,59.3) 0,58.8 -5.3,58.8 ccw(c-5.3,58.3) -5.8,58.3 -5.8,-1.7 ccw(c-5.3,-1.7) -5.3,-2.2 15.6,-2.2 cw(c15.6,-2.7) 16.1,-2.7 16.1,-5 ccw(c16.6,-5) 16.6,-5.5 21.235,-5.5 72.5,-5.5 ccw(c72.5,-5) 73,-5 73,7.274 73,63 ccw(c72.5,63) 72.5,63.5 51.001,63.5 11.8,63.5 ccw(c11.8,63) 11.3,63 11.3,61.4 cw(c10.8,61.4) 10.8,60.9 9.537,60.9 3.631,60.9 1,60.9 ; 0.5,60.45 cw(c0.95,60.45) 0.95,60.9
GND_35 (plane layer: these items are gaps in the copper):
  region: 20.306,47.186 18.557,48.935 12.624,48.935 11.683,47.994 11.683,43.936 13.101,42.517 18.1,42.517 20.306,44.723
  lines w0.254: 11.683,43.936 11.683,47.994 12.624,48.935 18.557,48.935 20.306,47.186 20.306,44.723 18.1,42.517 13.101,42.517 11.683,43.936
GND_57 (plane layer: these items are gaps in the copper):
  region: 20.306,47.186 18.557,48.935 12.624,48.935 11.683,47.994 11.683,43.936 13.101,42.517 18.1,42.517 20.306,44.723
  lines w0.254: 11.683,43.936 13.101,42.517 18.1,42.517 20.306,44.723 20.306,47.186 18.557,48.935 12.624,48.935 11.683,47.994 11.683,43.936
GND_810 (plane layer: these items are gaps in the copper):
  region: 20.28,47.186 18.53,48.935 12.598,48.935 11.657,47.994 11.657,43.936 13.075,42.517 18.074,42.517 20.28,44.723
  lines w0.254: 11.657,43.936 11.657,47.994 12.598,48.935 18.53,48.935 20.28,47.186 20.28,44.723 18.074,42.517 13.075,42.517 11.657,43.936
GND_1012 (plane layer: these items are gaps in the copper):
  region: 20.306,47.186 18.557,48.935 12.624,48.935 11.683,47.994 11.683,43.936 13.101,42.517 18.1,42.517 20.306,44.723
  lines w0.254: 11.683,43.936 13.101,42.517 18.1,42.517 20.306,44.723 20.306,47.186 18.557,48.935 12.624,48.935 11.683,47.994 11.683,43.936
Multi-Layer:
  pour cut-out: 17.628,43.473 17.628,43.715 17.337,43.64

## Silkscreen, mask and mechanical layers (free items; w line width, h text height)
Top Overlay:
  lines w0.178: 48.615,7.5 48.768,7.653 ; 48.921,7.5 48.768,7.653 ; 49.285,9.125 49.285,8.909 ; 49.502,8.909 49.285,8.909 ; 49.53,6.858 49.149,6.858 48.768,7.239 48.768,7.653 ; 50.038,9.398 49.775,9.398 49.285,8.909
  text "3V3PS" at 11.248,58.858 h0.76 r270
  text "3V3PS" at 33.001,56.549 h0.76
  text "P" at 23.591,56.407 h1.02
  text "N" at 48.141,56.407 h1.02
  text "N" at 20.747,56.333 h1.02
  text "P" at 45.297,56.333 h1.02
  text "GND" at 6.118,53.777 h0.76
  text "PLL IN1" at 19.331,53.479 h1.02
  text "PLL OUT" at 43.878,53.332 h1.02
  text "IN_SEL0" at 13.88,52.238 h0.76
  text "Vcc" at 14.375,50.854 h0.76
  text "SCL" at 11.631,49.941 h0.76 r270
  text "B" at 5.046,49.007 h0.76
  text "3V3APLL" at -3.902,47.232 h0.76
  text "SDA" at 11.635,46.974 h0.76 r270
  text "B" at 6.549,43.52 h0.76
  text "GND" at 11.545,41.726 h0.76
  text "1V8" at 5.173,39.317 h0.76
  text "PLL" at 15.025,38.998 h0.76 r90
  text "Lock" at 16.093,39.006 h0.76 r90
  text "SFP0 <-> GT0" at -4.325,36.568 h1.02
  text "Tx0" at 0.816,32.748 h0.76 r270
  text "Rx0" at 5.078,32.746 h0.76 r270
  text "Fault" at -0.253,32.74 h0.76 r270
  text "LOS" at 4.01,32.737 h0.76 r270
  text "P2V05" at -1.893,27.124 h0.76
  text "GND" at 16.688,23.546 h0.76
  text "P3V6" at -5.261,22.945 h0.76
  text "Fault" at -0.279,18.503 h0.76 r270
  text "Tx1" at 0.789,18.511 h0.76 r270
  text "LOS" at 4.011,18.502 h0.76 r270
  text "Rx1" at 5.079,18.511 h0.76 r270
  text "SFP1 <-> GT1" at -4.325,12.988 h1.02
  text "SI" at 56.64,11.167 h0.76
  text "GBTCLK1" at 7.39,11.046 h1.02
  text "LE" at 56.64,8.602 h0.76
  text "P" at 6.76,8.389 h1.02
  text "N" at 3.916,8.315 h1.02
  text "VADJ" at 63.568,7.603 h0.76
  text "P12V" at 69.454,7.478 h0.76
  text "SDO" at 56.64,6.078 h0.76
  text "SFP1Tx En" at 16.011,5.407 h0.76
  text "SFP0Tx En" at 23.756,5.407 h0.76
  text "P3V3" at 69.496,4.957 h0.76
  text "CLK" at 56.64,3.518 h0.76
  text "-" at 10.946,2.227 h1.02 r180
  text "-" at 12.724,2.227 h1.02 r180
  text "+" at 6.628,2.143 h1.02 r180
  text "+" at 8.406,2.143 h1.02 r180
  text "PT100" at 15.65,1.869 h0.76 r270
Bottom Overlay:
  lines w0.178: 40.272,5.016 40.544,5.016 41.034,5.505 ; 40.817,5.505 41.034,5.505 ; 41.034,5.288 41.034,5.505 ; 41.411,9.116 41.411,8.899 ; 41.628,8.899 41.411,8.899 ; 42.173,9.389 41.901,9.389 41.411,8.899 ; 48.523,8.1 48.523,7.883 ; 48.74,7.883 48.523,7.883 ; 49.403,8.373 49.013,8.373 48.523,7.883
  lines w0.254: 50.292,-1.856 51.308,-1.856 51.308,4.24 50.292,4.24
  text "SFP0" at -0.616,43.288 h1.02
  text "SFP1" at -0.889,6.223 h1.02
  text "B, X are exclusive" at 50.419,2.371 h1.02
  text "B: Bypass IC10" at 50.429,0.591 h1.02
  text "X: Use IC10" at 50.419,-1.143 h1.02
  text "Rev .Board_Revision" at 23.422,-4.424 h1.02
  text "May 2025" at 34.476,-4.577 h1.02
  text "PSLink_t2" at 46.283,-5.17 h1.02
Top Solder:
  drawing of 38 lines, arcs and shapes, not listed
  text "EP-ESE" at 61.672,1.526 h2.79
  text "CERN" at 66.748,-1.475 h1.38
  text "PSLink" at 38.481,-4.775 h3.81
Bottom Solder:
  lines w0.508: 0,58.8 ccw(c0,58.8) 0,58.8 ; 0,58.8 ccw(c0,59.3) 0.5,59.3 0.5,60.452 cw(c0.948,60.452) 0.948,60.9 10.808,60.9 ; 0,58.8 -5.3,58.8 ccw(c-5.3,58.3) -5.8,58.3 -5.8,-1.7 ccw(c-5.8,-1.7) -5.8,-1.7 ccw(c-5.3,-1.7) -5.3,-2.2 15.6,-2.2 cw(c15.6,-2.7) 16.1,-2.7 16.1,-5 ccw(c16.6,-5) 16.6,-5.5 24.361,-5.5 72.5,-5.5 ccw(c72.5,-5) 73,-5 ; 10.808,60.9 ccw(c10.808,60.9) 10.808,60.9 ; 10.808,60.9 ccw(c10.808,61.392) 11.3,61.392 11.3,63 cw(c11.8,63) 11.8,63.5 72.5,63.5 ; 72.5,63.5 ccw(c72.5,63.5) 72.5,63.5 ; 72.5,63.5 cw(c72.5,63) 73,63 73,-5 ; 73,-5 ccw(c73,-5) 73,-5